# Altium PCB DC-Motor-Driver-v1.0.PcbDoc (part 4 of 5)
Units mil, origin at the board's own origin, x right, y up, seen from the top; angles counter-clockwise.
Board outline 1968.5 x 1574.8 mil, 4 copper layers (Top Layer, Signal 1, Signal 2, Bottom Layer), stack 62.055 mil thick; 133 components, 124 nets, 619 pads, 342 vias.
Unrouted connection lines stored in the file: 5.
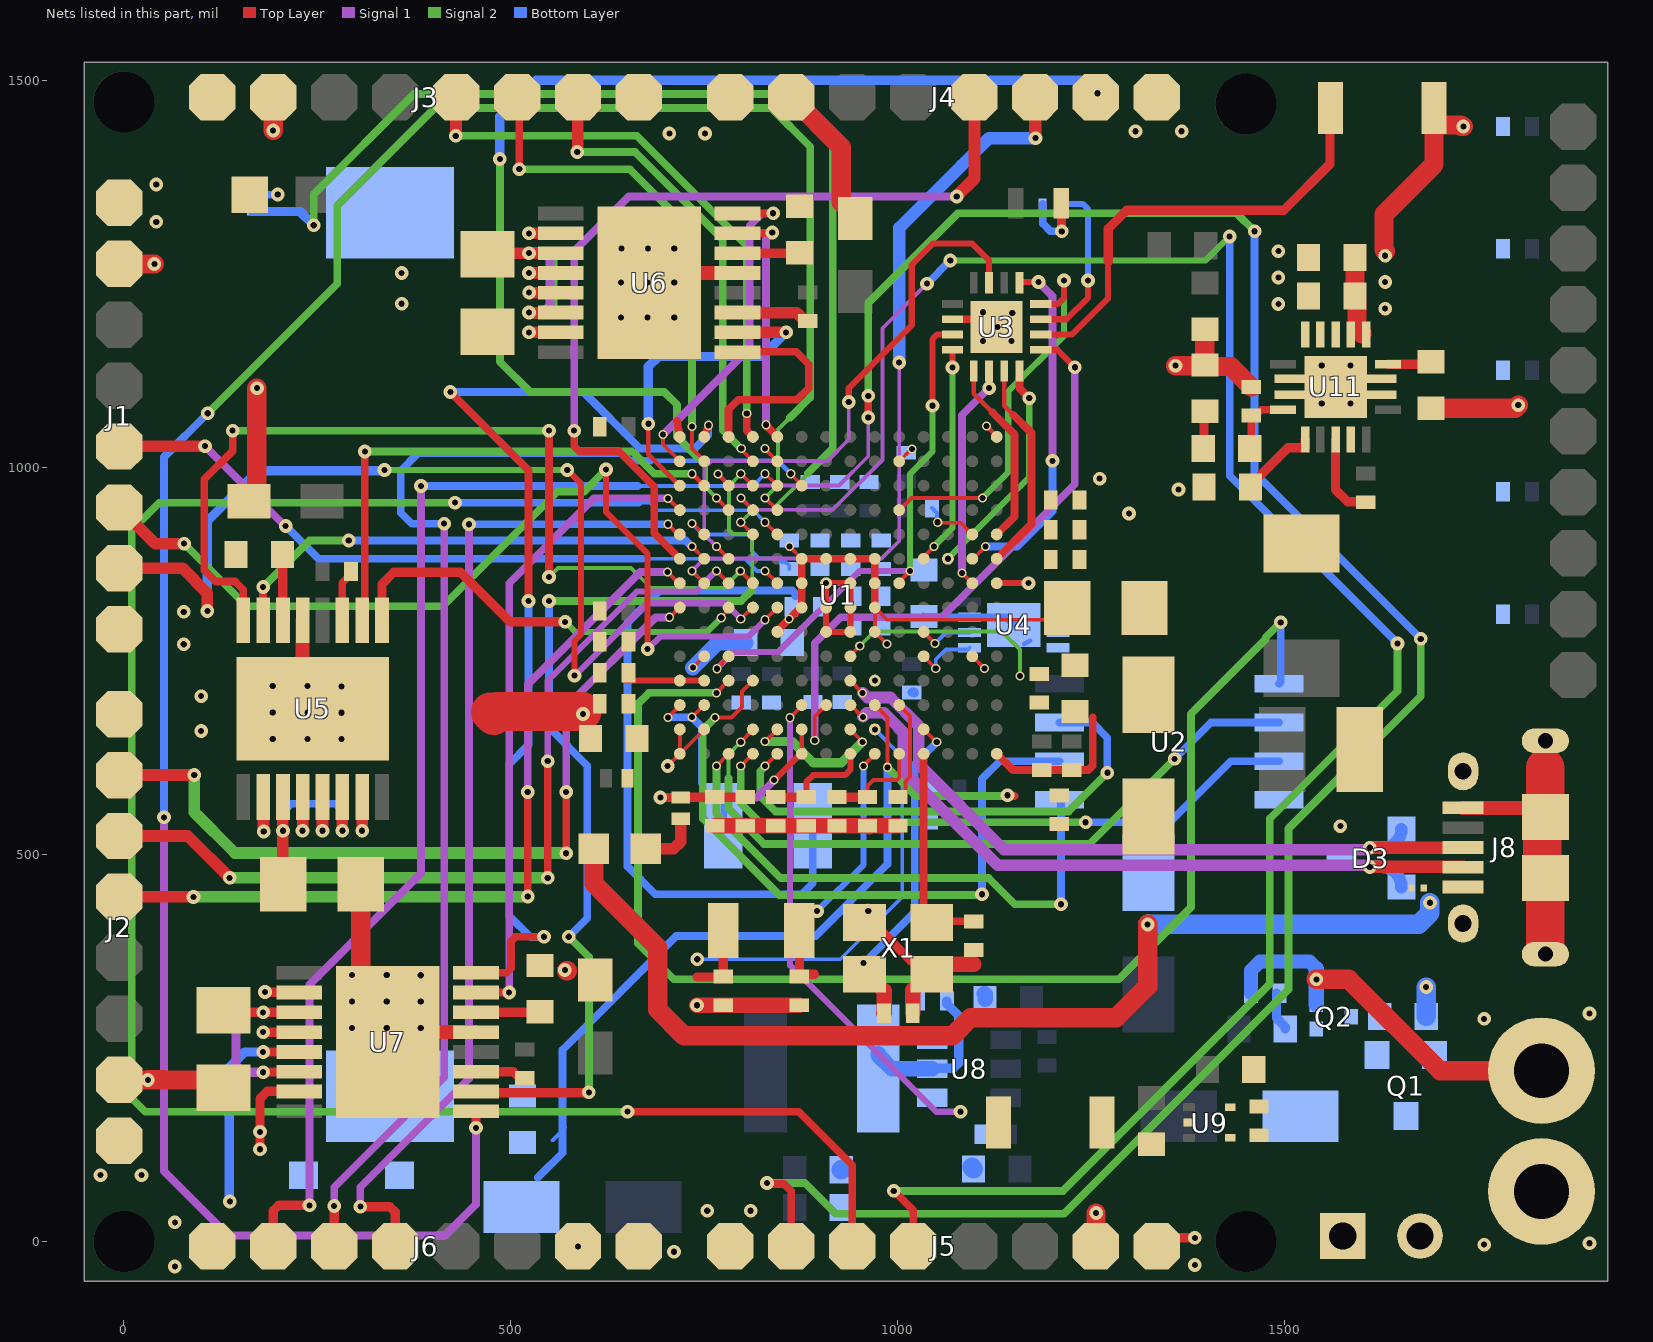
[diagram p4: the nets of this part, all layers, seen from the top]

## Via types
v1: diameter 17.72, hole 7.87, Top Layer to Bottom Layer, tented both sides, 254 vias
v2: diameter 11.81, hole 7.87, Top Layer to Bottom Layer, tented both sides, 88 vias

## Nets (pads, with @x,y where several pads share a name; then routed paths per layer and width w, separated by ;. In a path a pad name is that pad's centre, name@x,y a point inside that pad or via, vN(x,y) a via of type N, cw(c..) or ccw(c..) an arc to the next point about the centre after c; other vN are vias at no path point) (continued)
GND: C1.1 C2.1 C3.1 C4.1 C5.1 C6.1 C7.1 C8.1 C9.1 C10.1 C11.1 C12.1 C13.1 C14.1 C15.1 C16.1 C17.1 C18.1 C19.1 C20.1 C21.1 C22.1 C23.1 C24.1 C25.2 C26.1 C27.1 C28.1 C29.2 C30.1 C31.1 C32.1 C33.1 C34.1 C35.1 C36.1 C37.1 C38.1 C39.2 C40.2 C41.1 C42.2 C43.2 C44.1 C45.1 C46.1 C48.1 C49.2 C50.2 C51.2 C55.1 C56.1 C57.1 C59.1 C60.1 C61.1 C62.1 C63.1 C64.1 C65.1 C66.1 C67.1 C68.1 C69.1 D3.3 D4.1 D6.1 J1.2 J2.2 J3.2 J4.2 J5.2 J6.2 J7.2 J8.5 J8.MP1 J8.MP2 J8.S1 J8.S2 J8.S3 J8.S4 J9.2 Q2.2 R2.1 R3.1 R4.1 R5.1 R6.1 R7.1 R11.1 R13.1 R14.1 R15.1 R17.1 R18.1 R21.1 SW1.1 SW2.1 U1.A1 U1.A14 U1.B5 U1.B10 U1.E2 U1.E13 U1.G7 U1.G8 U1.G14 U1.H7 U1.H8 U1.J7 U1.J8 U1.K2 U1.K13 U1.L9 U1.N1 U1.N2 U1.N5 U1.N8 U1.P1 U1.P14 U2.4 U3.2 U3.17 U4.1 U4.2 U4.3 U4.4 U4.7 U4.9 U5.13 U5.17 U6.13 U6.17 U7.13 U7.17 U8.4 U9.2 U9.4 U11.2 U11.3 U11.15 X1.2 X1.4 | length 4800.3
  Top Layer w5: v1(702.8,614.76) U1.P1@718.54,630.51 ; U1.N1@718.54,662.01 U1.P1@718.54,630.51 ; v2(734.29,928.25) 735.03,928.25 749.3,913.98 U1.E2@750.04,913.98 ; v2(735.45,741.91) U1.K2@750.04,756.5 ; U1.N2@750.04,662.01 U1.P1@718.54,630.51 ; v2(828.78,646.26) U1.N5@844.53,662.01 ; v2(828.78,1024.89) 828.78,1024.21 U1.B5@844.53,1008.46 ; U1.N8@939.02,662.01 939.02,661.56 954.32,646.26 v2(954.32,645.81) ; U1.B10@1002.01,1008.46 1017.76,1024.21 v2(1018.41,1024.21) ; v2(1051.75,929.72) 1052.47,929 1081.24,929 1096.26,913.98 U1.E13@1096.5,913.98 ; U1.K13@1096.5,756.5 v2(1112.24,740.75) ; v2@1115,1053.48 v2(1115,1054) ; U1.A14@1127.99,1039.96 U1.A14@1127.99,1040.48
  Top Layer w6: v2@1115,1053.48 U1.A14@1127.99,1040.48
  Top Layer w8: U1.J7@907.52,787.99 U1.J8@939.02,787.99 U1.G8@939.02,850.98 v2(907.52,850.98) U1.H7@907.52,819.49 907.52,798.22 ; U1.J7@907.55,788.03 907.55,798.19 ; U1.G14@1127.99,850.98 v1(1169,851)
  Top Layer w10: 715,1061 716.59,1050.53 ccw(c734.29,1053.21) 716.69,1049.94 U1.A1@718.54,1039.96 ; U3.2@1070.83,1192 1118.07,1192 U3.17@1127.91,1182.16 ; U1.P14@1127.99,629.06 U1.P14@1127.99,630.26 ; U1.P14@1127.99,630.51 1149,609.5 C11.1@1186,609.5 C10.1@1225,609.5 1246.14,609.5 1252,615.36 1252,677.76
  Top Layer w12: X1.4@957.24,412.46 967.54,412.46 1016.84,363.16 1022.29,363.16 X1.2@1039.91,345.54 ; X1.4@970.25,409.75 X1.4@971.53,411.03
  Top Layer w18: U5.17@231,701.83 U5.17@244,688.83 ; U5.17@231.2,740 U5.13@231.2,803 ; U7.17@326.28,328.46 U7.17@339.28,315.46 ; U7.17@353.62,270.8 U7.13@455,270.8 ; U6.17@691.62,1251.8 U6.13@793,1251.8 ; J8.5@1730.7,560.62 J8.MP2@1825.19,560.62
  Top Layer w20: U7.17@340.83,258 U7.17@353.62,270.8 ; v1(740.59,305.5) C43.2@774.54,305.5 C42.2@873.04,305.5 ; C2.1@763.54,537.5 C1.1@803.04,537.5 C3.1@842.54,537.5 C4.1@882.04,537.5 C5.1@921.54,537.5 C6.1@961.04,537.5 C6.1@962.54,537.5 ; X1.4@952.54,417.16 X1.4@957.24,412.46 ; v1(961.97,427.14) 961.97,423.73 X1.4@963.54,422.16 ; C6.1@963.54,536.5 C6.1@962.54,537.5 ; C7.1@1000.54,537.5 C6.1@962.54,537.5 ; C39.2@1019.5,295 1019.5,324.91 1026.29,331.7 1026.29,331.91 1039.91,345.54 X1.2@1043.85,345.54 1056.81,358.5 1098.54,358.5
  Top Layer w25: J2.2@-6,209.3 -5.7,209 v1(31.14,209) ; J1.2@-5.74,1263.48 v1(39.5,1263.48) ; v1(31.14,209) 50.96,209.04 51,209 119,209 R15.1@129,199 ; C49.2@161.76,957 172,967.24 v1(172,1103) ; v1@193.26,1436 J3.2@193.26,1479 ; R13.1@306,462 306,292.83 U7.17@340.83,258 ; R14.1@452.5,1158.5 R14.1@470,1176 ; v1@572,350 v1@573,350 ; U6.17@674,1304 U6.17@686,1316 ; J4.2@862.56,1479 927,1414.56 C50.2@927,1342.95 ; J5.2@1256.26,-6 v1@1256.26,37 ; v1(1359,1132) 1396,1132 C69.1@1397,1133 ; R21.1@1397,1179 1397,1135.5 1398.5,1134 1397.25,1132.75 1399.02,1130.98 1430.52,1130.98 C68.1@1457,1104.5 ; v1(1541,339) 1583,339 1701.09,220.91 J7.2@1832,220.91 ; C65.1@1591,1272 C48.1@1591,1222 1593.5,1219.5 1593.5,1181.41 1600,1174.91 U11.2@1600,1173 ; v1@1630,1280 1628.52,1281.48 1628.52,1327.52 1693,1392 SW1.1@1693,1465 ; R17.1@1689,1077 1798,1077 v1(1802,1081) ; SW1.1@1695,1443 v1@1728,1443 ; v1@1728,1441 v1(1731,1441) ; J8.MP2@1825.19,560.62 J8.MP2@1837,548.81
  Top Layer w50: U5.17@244,688.83 U5.17@248.41,684.41 ; U7.17@339.28,315.46 U7.17@343.7,311.04 ; 473.59,684.41 478,680 483,685 v1@592.48,685 ; J8.MP1@1833,470.07 J8.MP2@1833,548.81 ; J8.S4@1837,381.49 J8.MP1@1837,470.07 ; J8.MP2@1837,548.81 1837,612
  Signal 2 w8: v2@907.52,850 v2(907.52,850.98)
  Signal 2 w12: v2(828.78,646.26) 863.74,646.26 891,619 927.5,619 v2(954.32,645.81)
  Bottom Layer w5: v2(734.29,928.25) 748.54,914 809.16,914 812.09,911.07 812.09,891.85 821.11,882.82 846.18,882.82 850.5,878.5 854.9,878.5 860,873.4 C31.1@860,869 ; C15.1@1016.62,1026 v2(1018.41,1024.21) ; C13.1@1044.5,948 1051,941.5 1051,930.47 v2(1051.75,929.72)
  Bottom Layer w6: U4.9@1163.7,772.44 U4.9@1171.1,776.57
  Bottom Layer w10: C12.1@1018,709.5 C12.1@1021.5,709.5 ; R2.1@1033,808 1034.16,806.84 U4.7@1092.91,806.84 1140.16,806.84 U4.9@1150,797
  Bottom Layer w12: C12.1@1019,710 1021,710 C12.1@1021.5,709.5
  Bottom Layer w18: R18.1@1456.5,321 1456.5,350.5 1468,362 1532,362 1541,353
  Bottom Layer w20: v1(570,351) v1@570.98,351 ; v2(735.45,741.91) 767.79,774.24 C28.1@803.78,774.24 ; R11.1@1112,320.5 1113,319.5 R11.1@1113,313 ; Q2.2@1541,306.5 v1(1541,339) 1541,353
  Bottom Layer w25: C61.1@927,93 C61.1@928,94 ; C60.1@1096,96 C60.1@1098,94 ; J8.S1@1729,409 J8.S1@1730.7,410.7 ; J8.S1@1730.7,409.98 J8.S1@1730.7,410.7 ; J8.S1@1730.7,411.02 J8.S1@1730.7,410.7 ; J8.S2@1730.7,607.87 J8.S2@1730.7,608.9
  other v1: 586.96,-6 1256.52,37 294.78,276.03 339.85,276.03 383.78,276.03 1757.91,287.91 1894,295 383.78,310.13 294.78,310.56 339.85,310.56 383.78,344.24 294.78,344.67 339.85,344.67 1572,537 192.5,649.4 237.57,649.4 281.5,649.4 593.48,682 192.5,683.93 237.57,683.93 281.5,683.5 192.5,718.04 237.57,718.04 281.5,717.61 1299,941 1363,972 1261,986 1548,1083 1585.27,1083 1548,1132 1585.27,1132 1110.27,1164 1147.27,1164 1129.18,1182.16 642.61,1194.5 676.72,1194.5 711.26,1194.5 1148.09,1200.31 1110.27,1201 1630,1205.73 642.61,1239.57 676.72,1239.57 711.26,1239.57 1630,1240 1630,1274 643.04,1283.5 677.15,1283.5 711.26,1283.5 193,1436
  other v2: 970.51,725
M1_A: J1.5 U1.G5 | length 924.2
  Top Layer w5: v2(828.78,866.73) U1.G5@844.53,850.98
  Top Layer w10: J1.5@-6,1027.52 J1.5@-5.48,1027
  Top Layer w15: J1.5@-5.48,1027 -4.72,1027.76 104.76,1027.76 v1(105,1028)
  Signal 1 w10: v1(105,1028) v1@208.67,924.33
  Bottom Layer w5: 670,882.48 802.72,882.48 818.47,866.73 v2(828.78,866.73)
  Bottom Layer w10: v1(209.22,924.88) 251.62,882.48 670,882.48
M1_B: J1.6 U1.H5 | length 1199.5
  Top Layer w5: v2(828.78,803.74) U1.H5@844.53,819.49
  Top Layer w8: v1(623,997.83) 623,943 676.9,889.1 v1(676.9,765.96)
  Top Layer w15: J1.6@-6,948.78 40.78,902 v1(78,902)
  Signal 1 w8: v1(676.9,765.96) 692.95,782 807.04,782 v2(828.78,803.74)
  Signal 2 w10: v1(78,902) 159,821 412,821 560,969 594.69,969 623,997.31 v1(623,997.83)
M1_Z: J1.7 U1.H4 | length 1319.5
  Top Layer w5: v2(797.28,804.65) 812.12,819.49 U1.H4@813.03,819.49
  Top Layer w8: v1(573,997.31) 591,979.31 591,784.81 582.54,776.36 v1(582.54,731.46)
  Top Layer w15: J1.7@-6,870.04 75.96,870.04 108,838 v1(108,815)
  Signal 1 w8: v1(582.54,731.46) 676.08,825 777.14,825 797.28,804.85 v2(797.28,804.65)
  Signal 2 w8: v1(337,997.31) v1(573,997.31)
  Bottom Layer w12: v1(108,815) 108,931 173.38,996.38 336.07,996.38 v1(337,997.31)
M2_A: J2.5 U1.G1 | length 1064.5
  Top Layer w5: v2(702.37,865.33) 716.72,850.98 U1.G1@718.54,850.98
  Top Layer w10: v1(522,446) v1(522,581)
  Top Layer w15: J2.5@-6,445.52 v1(90,445.52) v1@91,445.52
  Signal 1 w10: v1(522,581) 522,720 667.33,865.33 v2(702.37,865.33)
  Signal 2 w15: v1@91,445.52 91.24,445.76 v1@521.76,445.76
M2_B: J2.6 U1.G3 | length 1129.9
  Top Layer w5: v2(765.79,866.73) U1.G3@781.54,850.98
  Top Layer w10: v1(547.81,470.17) v1(547.81,621)
  Top Layer w15: J2.6@-6,524.26 82.68,524.26 v1(136.77,470.17)
  Signal 1 w8: v1(547.81,621) 547.81,724.81 663,840 739.06,840 v2(765.79,866.73)
  Signal 2 w15: v1(136.77,470.17) v1(547.81,470.17)
M2_Z: J2.7 U1.H1 | length 1036.6
  Top Layer w5: v2(705.34,806.91) 705.65,806.91 718.23,819.49 U1.H1@718.54,819.49
  Top Layer w10: v1(571.62,502) v1(571.62,581)
  Top Layer w15: J2.7@-6,603 v1(91,603)
  Signal 1 w10: v1(571.62,581) 571.62,691.04 687.14,806.56 705,806.56 v2(705.34,806.91)
  Signal 2 w15: v1(91,603) 91,555 143.69,502.31 v1@571.62,502.31
M3_A: J3.5 U1.A4 | length 735.4
  Top Layer w5: U1.A4@813.03,1039.96 U1.A4@813.03,1040.24
  Top Layer w10: v2(805,1070) 805,1048.27 U1.A4@813.03,1040.24
  Top Layer w15: v1(429,1429) 429.24,1429.24 429.24,1478.76 J3.5@429.48,1479
  Signal 2 w10: v1(429,1429) 663,1429 805,1287 v2(805,1070)
M3_B: J3.6 U1.B2 | length 654.5
  Top Layer w5: v2(734.29,1053.21) 734.29,1025.21 750.04,1009.47 U1.B2@750.04,1008.46
  Top Layer w10: J3.6@508.22,1479 511,1476.22 v1(511,1386)
  Signal 2 w10: v1(511,1386) 654,1386 734.29,1305.71 v2(734.29,1053.21)
M3_Z: J3.7 U1.B4 | length 610.9
  Top Layer w5: v2(797.94,1024.89) 797.94,1023.56 U1.B4@813.03,1008.46
  Top Layer w10: J3.7@586.96,1479 J3.7@589.32,1476.64
  Top Layer w15: v1(586,1408) 586.48,1408.48 586.48,1473.81 J3.7@589.32,1476.64
  Signal 2 w10: v1(586,1408) 661,1408 774,1295 774,1048.82 v2(797.94,1024.89)
M4_A: J4.5 U1.F1 | length 1148.1
  Top Layer w10: v1(582,1048) 582,1028 589,1021 640,1021 685.36,975.64 685.36,915.66 U1.F1@718.54,882.48
  Top Layer w16: v1(1076.37,1350.63) 1076.37,1351.09 1099.26,1373.98 J4.5@1099.26,1478.52
  Signal 1 w10: v1@582,1045 v1(582,1048) 582,1280.26 652.37,1350.63 v1(1076.37,1350.63)
M4_B: J4.6 U1.G2 | length 987.8
  Top Layer w5: v2(734.29,866.73) U1.G2@750.04,850.98 ; J4.6@1177.52,1479 J4.6@1178,1478.52
  Top Layer w16: v1(1178,1426) J4.6@1178,1478.52
  Signal 1 w5: v2(734.29,866.73) 750.35,882.79 979.29,882.79 1002,905.5 v1(1002,1136)
  Bottom Layer w16: v1(1002,1136) 1002,1310 1083,1391 1118,1426 v1(1178,1426)
M4_Z: J4.7 U1.D3 | length 1530.9
  Top Layer w5: v2(765.79,961.12) U1.D3@781.54,945.47
  Signal 2 w5: 742,1013 752.25,1002.75 752.25,974.75 765.79,961.22 v2(765.79,961.12)
  Signal 2 w10: v1(486,1399) 486,1137 525,1098 698.34,1098 715,1081.34 715,1040 742,1013
  Bottom Layer w12: v1(486,1399) 486,1454 532.86,1500.86 1241.14,1500.86 v1(1258,1484)
M5_A: J6.5 U1.E1 | length 1310.9
  Top Layer w5: v2(703.27,927.11) 716.4,913.98 U1.E1@718.54,913.98
  Top Layer w12: v1(305.67,45.33) 343.71,45.33 350.74,38.3 J6.5@350.74,-6
  Signal 1 w10: v1(305.67,45.33) 305.67,70.33 446,210.65 v1@446,927.86
  Bottom Layer w10: v1(446,927.11) v2(703.27,927.11)
M5_B: J6.6 U1.C6 | length 1654.5
  Top Layer w5: v2(861.9,992.41) 861.9,991.75 876.02,977.63 U1.C6@876.02,976.97
  Top Layer w12: J6.6@272,-6 v1@272,46.16
  Signal 1 w10: v1(271.84,46.16) 271.84,70.16 414,212.33 v1(414,927.86)
  Bottom Layer w6: 680,1008.98 845.32,1008.98 v2(861.9,992.41)
  Bottom Layer w10: v1(414,927.86) 372.14,927.86 357.86,942.14 357.86,996.36 380.19,1018.68 644.31,1018.68 654.02,1008.98 680,1008.98
M5_Z: J6.7 U1.C5 | length 1558.3
  Top Layer w5: v2(828.78,992.41) 828.94,992.41 844.37,976.97 U1.C5@844.53,976.97
  Top Layer w12: J6.7@193.26,-6 193.26,39.97 200.29,47 v1(240,47)
  Signal 1 w10: v1(240,47) 240,332 384,476 v1(384,976.45)
  Bottom Layer w5: 664,976.53 812.9,976.53 v2(828.78,992.41)
  Bottom Layer w10: v1(384,976.45) 644.93,976.45 645,976.53 664,976.53
M6_A: J5.5 U1.D4 | length 2709.1
  Top Layer w5: v2(797.41,961.12) U1.D4@813.03,945.47
  Top Layer w10: v1(995,65.64) 1020.04,40.6 J5.5@1020.04,-6
  Signal 1 w5: v2(797.41,961.12) 812.76,945.77 916.01,945.77 980.36,1010.12 980.36,1180.36 v1(1038,1238)
  Signal 2 w8: v1(1068,1268) 1398,1268 v1(1429,1299)
  Signal 2 w10: v1(995,65.64) 1213.64,65.64 1481,333 1481,546.74 1646,711.74 v1(1646,773)
  Bottom Layer w10: v1(1038,1238) v1(1068,1268) ; v1(1429,1299) 1429,990 v1(1646,773)
M6_B: J5.6 U1.E5 | length 2671.5
  Top Layer w5: v2(828.78,929.72) U1.E5@844.53,913.98
  Top Layer w10: v1(651,168) 872,168 941.3,98.7 J5.6@941.3,-6
  Signal 2 w10: v1(428,955) 46,955 10.28,919.28 10.28,185.41 27.69,168 v1(651,168)
  Bottom Layer w5: 665,955 680,955 689.87,945.13 813.37,945.13 v2(828.78,929.72)
  Bottom Layer w10: v1(428,955) 665,955
M6_Z: J5.7 U1.C3 | length 3049.1
  Top Layer w5: v2(767.66,991.93) 767.66,991.39 781.54,977.51 U1.C3@781.54,976.97
  Top Layer w10: v1(831.14,75.95) 832.62,74.47 853.53,74.47 862.56,65.44 J5.7@862.56,-6 ; v1(962,1065) v1(962,1093)
  Signal 1 w5: v2(767.66,991.93) 782.59,977 924,977 962,1015 v1(962,1065)
  Signal 2 w10: v1(831.14,75.95) 880.05,75.95 920,36 1215,36 1505,326 1505,534 1676,705 v1(1676,779) ; v1(962,1093) 962,1213 1078,1329 1437.93,1329 v1(1461.27,1305.67)
  Bottom Layer w10: v1(1461.27,1305.67) 1461.27,993.73 v1(1676,779)
MOTOR_1+: J1.8 U5.2 | length 44.9
  Top Layer w15: U5.2@180.02,574.65 180.47,574.21 180.47,530.55 v1(180.91,530.11)
  other v1: 77.46,772 77.46,813.93
MOTOR_1-: J1.1 U5.4 | length 47.3
  Top Layer w10: U5.4@231.1,574.55 U5.4@231.2,574.65
  Top Layer w15: J1.1@-6,1342.48 J1.1@-3.49,1344.99 ; v1(231,531) 231.1,531.1 U5.4@231.1,574.55
  other v1: 42,1317.93 42,1366
MOTOR_1_B: U1.F2 U5.15 | length 648.1
  Top Layer w5: v2(734.29,898.23) U1.F2@750.04,882.48
  Top Layer w10: U5.15@180.02,803 v1(180.02,846)
  Signal 1 w10: v2@733.8,898.23 v2(734.29,898.23)
  Signal 2 w10: v1(180.02,846) 240.02,906 v1(290.64,906)
  Bottom Layer w10: v1(290.64,906) 726.52,906 v2(734.29,898.23)
MOTOR_1_F: U1.G4 U5.16 | length 1187.8
  Top Layer w5: v2(796.69,866.73) 812.43,850.98 U1.G4@813.03,850.98
  Top Layer w10: v1(140.69,1048) 140.69,1021.69 104,985 104,868 119,853 144,853 154.43,842.57 U5.16@154.43,803 ; v1(549.46,859) v1(549.46,1048)
  Signal 2 w5: v1(549.46,859) 549.88,859 561.24,870.36 655.64,870.36 681,845 774.95,845 v2(796.69,866.73)
  Signal 2 w10: v1(140.69,1048) v1(549.46,1048)
MOTOR_2+: J2.8 U5.7 | length 44.3
  Top Layer w15: J2.8@-6,681.74 J2.8@-5.55,681.29 ; v1(307.98,531) U5.7@307.98,574.65
  other v1: 100,659.93 100,705
MOTOR_2-: J2.1 U5.5 | length 43.7
  Top Layer w15: v1(256.8,531) U5.5@256.8,574.65
  other v1: -30,86 23,86
MOTOR_2_B: U1.C2 U5.10 | length 676.5
  Top Layer w5: v2(734.29,992.41) v2@734.45,992.41 ; U1.C2@749.88,976.97 U1.C2@750.04,976.97
  Top Layer w6: v2@734.45,992.41 U1.C2@749.88,976.97
  Top Layer w10: U5.10@307.98,803 311.5,806.52 v1(311.5,1021.19)
  Signal 2 w10: v1(311.5,1021.19) 656.81,1021.19 685.59,992.41 v2(734.29,992.41)
MOTOR_2_F: U1.H3 U5.9 | length 548.1
  Top Layer w5: v2(772,806.23) 772,807.57 781.54,817.11 U1.H3@781.54,819.49
  Top Layer w12: U5.9@333.57,803 333.57,849.57 349,865 435,865 499,801 v1(570.32,801)
  Signal 2 w8: v1(570.32,801) 583.33,787.99 753.76,787.99 v2(772,806.23)
MOTOR_3+: J3.8 U6.2 | length 50.4
  Top Layer w15: v1(523.73,1302.98) U6.2@564.65,1302.98 ; J3.8@665.7,1479 671.09,1473.61 J3.8@671.09,1471.97
  Signal 2 w10: v1@523.59,1303.12 v1(523.73,1302.98)
  other v1: 705,1431.93
MOTOR_3-: J3.1 U6.4 | length 40.9
  Top Layer w15: v1(523.73,1251.8) U6.4@564.65,1251.8
  other v1: 359,1212 359,1251.8
MOTOR_3_B: U1.A5 U6.15 | length 318.8
  Top Layer w5: v2@829.94,1055.11 v2(829.94,1055.67) ; U1.A5@844.53,1039.96 U1.A5@844.53,1040.52
  Top Layer w10: U6.15@793,1302.98 793.51,1303.49 837.49,1303.49 v1(838,1304) ; v2@829.94,1055.11 U1.A5@844.53,1040.52
  Signal 1 w10: v2(829.94,1055.67) 829.94,1295.94 v1(838,1304)
MOTOR_3_F: U1.B1 U6.16 | length 442.9
  Top Layer w5: v2(697,1043) 697,1030.01 U1.B1@718.54,1008.46
  Top Layer w10: U6.16@793,1328.57 793.22,1328.78 838.93,1328.78 v1(839.14,1329)
  Signal 1 w10: v2(697,1043) 808.79,1154.79 808.79,1312.79 825,1329 v1(839.14,1329)
MOTOR_4+: J4.8 U6.7 | length 42.6
  Top Layer w10: J4.8@1335,1479 J4.8@1336,1480
  Top Layer w15: v1(523.63,1175.13) 523.68,1175.08 564.6,1175.08 U6.7@564.65,1175.02
  Signal 1 w15: v1@523.53,1175.02 v1(523.63,1175.13)
  other v1: 1307.46,1434.93 1367,1434.93
MOTOR_4-: J4.1 U6.5 | length 44.5
  Top Layer w10: J4.1@783,1478.18 J4.1@783.82,1479
  Top Layer w15: v1(523.76,1226.6) 523.96,1226.4 564.45,1226.4 U6.5@564.65,1226.2 ; J4.1@783,1478.18 J4.1@783.78,1477.4
  Signal 2 w16: v1@523.43,1226.28 v1(523.76,1226.6)
  Bottom Layer w15: v1@523.24,1227.12 v1(523.76,1226.6)
  other v1: 751,1431.93
MOTOR_4_B: U1.C1 U6.10 | length 429.9
  Top Layer w6: v1(677.86,1057) 677.86,1017.65 U1.C1@718.54,976.97
  Top Layer w15: U6.10@793,1175.02 v1(855.86,1175.02)
  Bottom Layer w12: v1(677.86,1057) 677.86,1130.86 691,1144 824.83,1144 v1(855.86,1175.02)
MOTOR_4_F: U1.A3 U6.9 | length 271
  Top Layer w10: U1.A3@781.54,1039.96 781.54,1075.54 786.12,1080.12 794,1088 870,1088 885,1103 885,1134 869,1150 U6.9@802,1150
MOTOR_5+: J6.8 U7.2 | length 44.3
  Top Layer w12: v1(182.6,322.63) 182.93,322.3 226.33,322.3 U7.2@226.65,321.98
  other v1: 66,-32 66,25
MOTOR_5-: J6.1 U7.4 | length 62.1
  Top Layer w12: v1(180.14,270.8) U7.4@226.65,270.8 ; J6.1@665.7,-6 J6.1@676.7,5
  other v1: 711,-13
MOTOR_5_B: U1.D1 U7.15 | length 843.9
  Top Layer w5: v2(703.27,960.54) U1.D1@718.33,945.47
  Top Layer w10: U7.15@455,321.98 v1(498,321.98)
  Signal 1 w10: v1(498,321.98) 498,850.88 607.66,960.54 v2(703.27,960.54)
MOTOR_5_F: U1.A2 U7.16 | length 1314.3
  Top Layer w10: v1(422,1098) 523,997 v1(523,828) ; U7.16@455,347.57 494.57,347.57 500.42,353.42 500.42,388.14 506.28,394 v1(543,394) ; U1.A2@750.04,1039.96 750.59,1041.46 v2(755.62,1055)
  Bottom Layer w10: v1(422,1098) 594,1098 666.91,1025.09 738.09,1025.09 755.27,1042.27 755.27,1054.65 v2(755.62,1055) ; v1@523,830.05 v1(523,828) 523,642 498.19,617.19 498.19,420.81 525,394 v1(543,394)
MOTOR_6+: J5.8 U7.7 | length 120.2
  Top Layer w12: v1(176,119.5) 176,184.88 185.56,194.44 226.24,194.44 U7.7@226.65,194.02
  other v1: 754,40 810,40 176,142
MOTOR_6-: J5.1 U7.5 | length 326
  Top Layer w12: v1(180.14,245.2) U7.5@226.65,245.2 ; J5.1@1335,-6 1346,5 v1(1384,5)
  Bottom Layer w12: v1(137,51.86) 136.22,52.64 136.22,225.22 156.2,245.2 v1(180.14,245.2)
  other v1: 1384,-30
MOTOR_6_B: U1.C4 U7.10 | length 1294.6
  Top Layer w5: v2(797.28,992.41) 797.44,992.41 812.88,976.97 U1.C4@813.03,976.97
  Top Layer w12: U7.10@455,194.02 456.52,192.5 600.5,192.5 v1(601,193)
  Signal 2 w5: v2(797.28,992.41) 797.28,991.93 782,976.65 782,941.23 781.88,941.11 781.88,919.12 786.68,914.32 806.68,914.32 812.09,908.91 812.09,855
  Signal 2 w10: v1(549.46,828) 798,828 812.09,842.09 812.09,855 ; v1(575,394) 601,368 v1(601,193)
  Bottom Layer w10: v1(549.46,828) 549.46,664.54 599,615 599,418 v1(575,394)
MOTOR_6_F: U1.D5 U7.9 | length 3092.2
  Top Layer w5: v2(828.78,961.22) U1.D5@844.53,945.47
  Top Layer w12: v1(455,147.14) U7.9@455,168.43
  Signal 1 w10: v1(52,548.36) 52,91 135,8 415,8 455,48 v1(455,147.14)
  Signal 2 w5: v2(828.78,961.22) 845.34,977.78 845.34,1049.34 861,1065
  Signal 2 w10: v1(108.52,1070.52) 276,1238 276,1339 402,1465 837,1465 887,1415 887,1091 861,1065
  Bottom Layer w10: v1@52,555.36 52,1014 v1(108.52,1070.52)
NetC1_2: C1.2 C2.2 FB1.2 U1.N6 U1.P6 | length 348.3
  Top Layer w6: U1.P6@876.02,630.51 U1.N6@876.02,662.01
  Top Layer w8: v2(840.41,596.41) 874.51,630.51 U1.P6@876.02,630.51
  Top Layer w12: v1(693.35,574) FB1.2@719.54,574 ; FB1.2@719.54,572 723.48,572 725.98,574.5 C2.2@763.54,574.5 C1.2@803.04,574.5
  Signal 1 w10: v1(693.35,574) 818,574 v2(840.41,596.41)
NetC3_2: C3.2 C4.2 U1.P8 | length 143.1
  Top Layer w8: C4.2@882.04,574.5 882.04,594.04 891,603 932,603 939.02,610.02 U1.P8@939.02,630.51
  Top Layer w12: C3.2@842.54,574.5 C4.2@882.04,574.5
NetC5_2: C5.2 C6.2 U1.P10 | length 130.5
  Top Layer w5: C6.2@961.04,574.5 961.04,589 968.54,596.5 999.08,596.5 1002.14,599.56 1002.14,630.38 U1.P10@1002.01,630.51
  Top Layer w12: C5.2@921.54,574.5 C6.2@961.04,574.5
NetC7_2: C7.2 U1.M10 | length 133.2
  Top Layer w5: C7.2@1001.82,576 1005,576 1010,581 1010,594.69 1016.19,600.88 1016.19,679.33 U1.M10@1002.01,693.5
  Top Layer w10: C7.2@1000.54,574.5 C7.2@1001.98,575.93
NetC24_2: C24.2 C25.1 C26.2 C27.2 FB2.2 U1.L1 U1.L2 | length 101.6
  Top Layer w8: C26.2@648.47,725 U1.L1@718.54,725 U1.L2@750.04,725
NetC28_2: C28.2 C29.1 C30.2 C31.2 C32.2 C33.2 C34.2 C35.2 C36.2 C37.2 C38.2 C41.2 L1.1 U1.F6 U1.F7 U1.F8 U1.F9 U1.G6 U1.G9 U1.H6 U1.H9 U1.J5 U1.J9 | length 1465.8
  Top Layer w5: v2(860.28,898.23) U1.F6@876.02,882.48 ; U1.H9@970,820 U1.H9@970.51,819.49 ; v2(986.26,772.24) U1.J9@970.51,787.99 U1.H9@970.51,819.49 ; C41.2@1198.33,803.74 986.26,803.74 U1.H9@970.51,819.49
  Top Layer w10: U1.J5@844.53,787.99 844.53,789.44 v2@859.21,804.12 ; v2@859.9,804.81 874.58,819.49 U1.H6@876.02,819.49 U1.G6@876.02,850.98 U1.F6@876.02,882.48 U1.F7@907.52,882.48 U1.F8@939.02,882.48 U1.F9@970.51,882.48 U1.G9@970.51,850.98 U1.H9@970.51,819.49
  Bottom Layer w8: C31.2@860.28,898.28 C31.2@861,899
  Bottom Layer w10: 868,834 868,837.5 864,841.5 692.58,841.5 664.54,813.46 660.14,809.06 651,799.92 651,484.86 686.86,449 876,449 890.37,463.37 L1.1@890.37,537.5
  other v2: 859.55,804.46
NetC39_1: C39.1 U1.N11 X1.1 | length 423.6
  Top Layer w5: U1.N11@1033.5,662.01 1033.79,662.01 1050.28,645.52 v2(1050.57,645.52)
  Top Layer w20: v1(956,360) 956,346.77 X1.1@957.24,345.54 ; X1.1@961.17,345.54 982.5,324.21 C39.1@982.5,295 C39.1@982,295.5
  Bottom Layer w10: v1(956,360) 1022,426 1022,616.96 v2(1050.57,645.52)
NetC40_1: C40.1 U1.P11 X1.3 | length 301.3
  Top Layer w8: X1.3@1043.85,412.46 X1.3@1060.81,395.5
  Top Layer w10: U1.P11@1033.5,632.97 1033.5,425.5 1045,414 C40.1@1098.54,414
NetC42_1: C42.1 U1.P9 X2.2 | length 314.7
  Top Layer w5: v2(955.92,614.76) 955.92,615.34 970.51,629.93 U1.P9@970.51,630.51
  Top Layer w12: X2.2@872.76,402 873.04,401.71 C42.1@873.04,342.5 876.04,345.5 892.5,345.5
  Bottom Layer w8: v1(895.69,427.14) 955.92,487.38 v2(955.92,614.76)
NetC43_1: C43.1 U1.N9 X2.1 | length 622.8
  Top Layer w12: 740.59,342 C43.1@774.04,342 ; X2.1@774.33,402 774.54,401.79 C43.1@774.54,342.5
  Bottom Layer w5: v1(741,365) 925.79,365 1006,445.21 1006,626.52 v2(970.51,662.01)
NetC44_2: C44.2 C45.2 D7.2 U1.K8 | length 276.8
  Top Layer w5: U1.K8@939.02,756.5 939.02,757.83 v2(951.09,769.91)
  Signal 2 w5: v2(951.09,769.91) 969.74,788.55 1134.45,788.55 1158,765 v2(1158,731)
NetC46_2: C46.2 D1.1 D7.1 R20.1 U1.M9 | length 1113.5
  Top Layer w5: U1.M9@970.96,693.5 987,677.46 987,613.27 v2(986.73,613)
  Top Layer w10: v1(1141.86,576.86) 1142.72,576 1151,576
  Signal 2 w10: v2(986.73,613) 986.73,612.87 1023.6,576 1141,576 v1(1141.86,576.86)
  Bottom Layer w5: 554,131 570.5,147.5
  Bottom Layer w10: 535,83 567,115 567,248 714,395 894,395 986.73,487.73 v2(986.73,613)
NetC47_1: C47.1 L3.1 U11.11 U11.12 | length 109.4
  Top Layer w12: U11.11@1565.91,1036.56 1565.91,971.75 1581.67,956 C47.1@1604,956
NetC52_1: C52.1 U5.11 | length 67.6
  Top Layer w10: U5.11@282.39,803 282.39,851.39 293.5,862.5 C52.1@293.5,866
NetC53_1: C53.1 U6.11 | length 95.6
  Top Layer w15: U6.11@793,1200.61 793.11,1200.5 869.5,1200.5 880.5,1189.5 C53.1@884,1189.5
NetC54_1: C54.1 U7.11 | length 64.1
  Top Layer w12: U7.11@455,219.61 503.39,219.61 C54.1@511.5,211.5 ; C54.1@515,211.5 C54.1@518,208.5
NetC55_2: C55.2 U5.14 | length 85.3
  Top Layer w12: C55.2@205,888 205.31,887.69 205.31,803.31 U5.14@205.61,803
NetC56_2: C56.2 U6.14 | length 79.4
  Top Layer w12: U6.14@793,1277.39 C56.2@872.39,1277.39
NetC57_2: C57.2 U7.14 | length 83
  Top Layer w12: U7.14@455,296.39 C57.2@538,296.39
NetC58_1: C58.1 L2.1 U8.5 | length 202.9
  Bottom Layer w12: U8.5@1045,223.4 1045.6,224 1071.97,224 1079,231.03 1079,292 1063.5,307.5 C58.1@1063.5,311
  Bottom Layer w20: L2.1@974.97,243 974.97,240.96 992.53,223.4 U8.5@1045,223.4
NetC58_2: C58.2 U8.6
NetC67_2: C67.2 U11.9 | length 102.3
  Top Layer w12: C67.2@1459,975 1459,980.5 1504.33,1025.83 1526.06,1025.83 1526.54,1026.32 U11.9@1526.54,1036.56
NetC68_2: C68.2 R16.2 U11.8 | length 74.9
  Top Layer w10: R16.2@1455,1025 1457,1027 1457,1064 C68.2@1456,1065 ; C68.2@1466,1071 1469.94,1074.94 U11.8@1498,1074.94
NetC69_2: C69.2 R16.1 | length 49.2
  Top Layer w12: C69.2@1394,1073 1396,1071 1396,1026 R16.1@1395,1025
NetF1_2: F1.2 FB1.1 | length 78.4
  Top Layer w15: F1.2@674.46,508 710.76,508 719.54,516.79 FB1.1@719.54,546.44
NetL1_2: L1.2 U1.M1 U1.M2 | length 208.7
  Top Layer w5: v2(703.24,677.31) 703.24,677.76 718.54,693.06 U1.M1@718.54,693.5 ; v2(734.29,677.76) U1.M2@750.04,693.5
  Bottom Layer w5: L1.2@750,549.04 L1.2@761.54,537.5
  Bottom Layer w8: v2(703.24,677.31) v2@703.47,677.53 ; v2@734.07,677.53 v2(734.29,677.76) ; L1.2@775.5,540.01 L1.2@775.5,566.86
  Bottom Layer w10: v2@703.47,677.53 v2@734.07,677.53 ; v2(734.29,677.76) 747,665.05 747,593.5
NetLED1_2: LED1.2 R1.1 | length 90.6
  Top Layer w12: LED1.2@1211.53,1342 1211.76,1341.76 1211.76,1305.88 v1(1212,1305.64)
  Bottom Layer w10: R1.1@1187.35,1341 1187.35,1315.86 1197.56,1305.64 v1(1212,1305.64)
NetLED2_2: LED2.2 R22.2 | length 33
  Top Layer w10: LED2.2@162.66,1353 LED2.2@162.83,1353.17
  Bottom Layer w10: R22.2@166.32,1352.97 175.11,1352.97 ; 175.14,1353 198.83,1353 v1(199,1353.17)
NetQ1_1: Q1.1 Q2.3 R9.2
NetQ2_1: Q2.1 R10.2 R18.2 | length 50.8
  Bottom Layer w12: R18.2@1489.5,321 1489.5,289 1501,277.5 R10.2@1501,275
NetR1_2: R1.2 U3.11 | length 226.5
  Top Layer w8: U3.11@1185,1192 1218,1192 1246,1220 v1(1246,1242)
  Bottom Layer w8: R1.2@1209,1341 1239,1341 1246,1334 v1(1246,1242)
NetR2_2: R2.2 U1.G10 U1.K3 U3.3 | length 686.4
  Top Layer w5: v2(766.34,740.41) 766.34,740.85 781.54,756.05 U1.K3@781.54,756.5 ; U1.G10@1000.35,850.98 v2(1016.09,866.73)
  Top Layer w8: v1(1045,1080.23) 1045,1166 1051.31,1172.31 U3.3@1070.83,1172.31
  Signal 1 w8: v2(766.34,740.41) 787.94,762 846,762 950.73,866.73 v2(1016.09,866.73)
  Signal 2 w8: v2(1016.09,866.73) 1016.09,992.09 1045,1021 v1(1045,1080.23)
NetR13_2: R13.2 U5.3 U5.6 | length 292.2
  Top Layer w15: U5.3@205.61,574.65 v1(205.61,531) 205.61,462.39 R13.2@206,462 ; v1(282.39,531) U5.6@282.39,574.65
  Bottom Layer w10: v1(205.61,531) 205.61,555.61 216,566 274,566 282.39,557.61 v1(282.39,531)
NetR14_2: R14.2 U6.3 U6.6 | length 386.2
  Top Layer w15: R14.2@470,1276 471.39,1277.39 v1(523.73,1277.39) U6.3@564.65,1277.39 ; v1(523.73,1200.61) U6.6@564.65,1200.61
  Signal 1 w12: v1(523.73,1200.61) 524.35,1200 543.68,1200 550.71,1207.03 550.71,1270.36 543.68,1277.39 v1(523.73,1277.39)
  Signal 2 w15: v1(523.73,1200.61) 544.19,1200.61 553,1209.42 553,1271.53 547.14,1277.39 v1(523.73,1277.39)
NetR15_2: R15.2 U7.3 U7.6 | length 278.9
  Top Layer w12: R15.2@129,299 131.61,296.39 185.98,296.39 U7.3@226.65,296.39 ; v1(180.14,219) 180.45,219.31 226.35,219.31 U7.6@226.65,219.61
  Signal 1 w12: v1(180.14,219) 153,219 145,227 145,280 161.27,296.27 180.03,296.27 v1(180.14,296.39)
NetR17_2: R17.2 U11.1 | length 64.1
  Top Layer w12: U11.1@1633.83,1134 1688,1134 R17.2@1695,1141
NetSW1_2: SW1.2 U3.10 | length 590.3
  Top Layer w8: U3.10@1185,1172.31 1185.16,1172.16 1225.16,1172.16 1272,1219 1272,1267
  Top Layer w12: 1272,1267 1272,1309 1296,1333 1499,1333 1558.57,1392.57 1558.57,1464.43 SW1.2@1559.14,1465
NetSW2_2: SW2.2 U1.M6 | length 641.1
  Top Layer w5: v2(861.05,677.09) 876.02,692.07 U1.M6@876.02,693.5
  Signal 1 w8: v2(861.05,677.09) 861.04,356.96 1050.14,167.86 v1(1081.11,167.86)
NetU1_D10: U1.D10 U3.12 | length 494.1
  Top Layer w5: U1.D10@1002.01,945.47 1017.76,961.22 v2(1109.75,961.22)
  Top Layer w8: U3.12@1185,1211.68 1206.69,1211.68 1215,1220 v1(1215,1242)
  Signal 2 w8: v2(1109.75,961.22) 1143,994.47 1143,1099 1215,1171 v1(1215,1242)
NetU1_E14: U1.E14 U3.5 | length 242.4
  Top Layer w6: U3.5@1098.39,1125.07 1098.39,1095.94 1122.42,1071.91
  Top Layer w10: 1122.42,1071.91 1151,1043.32 1151,936.98 U1.E14@1127.99,913.98
NetU1_F3: U1.F3 U3.15 | length 740.9
  Top Layer w5: v2(765.79,898.23) U1.F3@781.54,882.48
  Top Layer w8: v1(936.86,1085) 936.86,1103.12 1018.14,1184.4 1018.14,1262.14 1046,1290 1095.87,1290 1118.07,1267.8 U3.15@1118.07,1239.24
  Signal 1 w5: v2(765.79,898.23) 750,914.02 750,999.79 759.21,1009 909.23,1009 936.86,1036.63 v1(936.86,1085)
NetU1_F11: U1.F11 U3.4 | length 285.6
  Top Layer w5: U1.F11@1033.5,882.48 1033.5,884.94 v2(1046.96,898.4)
  Top Layer w8: v1@1070.83,1129.74 1070.91,1129.83 1070.91,1152.54 U3.4@1070.83,1152.63
  Signal 2 w8: v2(1046.96,898.4) 1070.91,922.35 v1(1070.91,1129.66)
NetU1_F12: U1.F12 U3.8 | length 291.4
  Top Layer w10: U3.8@1157.44,1125.07 1157.44,1102.67 v1(1170.11,1090)
  Signal 2 w8: v2(1065,882.48) 1170.11,987.59 v1(1170.11,1090)
NetU1_F13: U1.F13 U3.13 | length 457.4
  Top Layer w5: U1.F13@1096.5,882.48 1097.74,882.48 v2(1113.49,898.23)
  Top Layer w8: U3.13@1157.44,1239.24 1158.2,1240 v1(1182,1240)
  Signal 1 w10: v1(1182,1240) 1200.14,1221.86 v1(1200.14,1009)
  Bottom Layer w10: v2(1113.49,898.23) 1154.23,898.23 1200.14,944.14 v1(1200.14,1009)
NetU1_F14: U1.F14 U3.7 | length 277.3
  Top Layer w5: U3.7@1136.69,1124 U3.7@1137.76,1125.07
  Top Layer w6: U3.7@1137.76,1125.07 1137.76,1080.24 1149.54,1068.46
  Top Layer w10: U1.F14@1127.99,882.48 1173,927.49 1173,1045 1149.54,1068.46
NetU1_G13: U1.G13 U3.6 | length 285.8
  Top Layer w5: v2(1083,864) 1083.24,864 1096.26,850.98 U1.G13@1096.5,850.98
  Top Layer w10: U3.6@1118.15,1116.29 1118.15,1103.36 v1(1118.26,1103.26)
  Signal 1 w10: v2(1083,864) 1083,1068 v1(1118.26,1103.26)
NetU1_J11: U1.J11 U4.6 | length 71.4
  Top Layer w5: U1.J11@1033.5,787.99 v2(1048.35,773.14)
  Bottom Layer w5: v2(1048.35,773.14) 1062.37,787.16 1081.34,787.16 U4.6@1092.91,787.16
NetU1_K11: U1.K11 U4.5 | length 83.7
  Top Layer w5: U1.K11@1033.5,756.5 v2(1049.25,740.75)
  Bottom Layer w5: v2(1049.25,740.75) 1049.25,752.25 1062.3,765.3 1090.74,765.3 U4.5@1092.91,767.47
NetU1_L3: U1.L3 U2.1 | length 1707.5
  Top Layer w5: v2(765.79,709.25) U1.L3@781.54,725
  Signal 2 w10: v2(765.79,709.25) 678.8,709.25 664.54,695 664.54,385.46 710.86,339.14 1285.82,339.14 1379,432.33 1379,682 1475.77,778.77 1475.77,781.13 v1(1495,800.36)
  Bottom Layer w10: U2.1@1492.93,721 1495,723.07 v1(1495,800.36)
NetU1_L4: U1.L4 U2.6 | length 878.5
  Top Layer w5: v2(764.05,677.35) 785.43,677.35 798.85,690.77 798.85,710.82 U1.L4@813.03,725
  Signal 2 w10: v2(764.05,677.35) 748,661.29 748,547 847,448 1108,448 v1(1109,449)
  Bottom Layer w10: v1(1109,449) 1109,598 1132,621 U2.6@1209.07,621
NetU1_M7: U1.M7 U3.9 | length 803.5
  Top Layer w5: v2(892.91,647.51) 892.91,678.89 U1.M7@907.52,693.5
  Top Layer w8: U3.9@1185,1152.63 1206.37,1152.63 v1(1229,1130)
  Signal 1 w10: v2(892.91,647.51) 892.91,773.38 926.53,807 1057,807 1229,979 v1(1229,1130)
NetU1_N4: U1.N4 U2.2 | length 910.8
  Top Layer w5: v2(797.28,645.48) 797.28,645.87 813.03,661.62 U1.N4@813.03,662.01
  Signal 2 w5: 781.54,599.02 781.54,629.73 v2(797.28,645.48)
  Signal 2 w10: 781.54,599.02 781.54,559.46 827,514 1248,514 v1(1358,624)
  Bottom Layer w10: v1(1358,624) 1405,671 U2.2@1492.93,671
NetU1_P3: U1.P3 U2.5 | length 713.4
  Top Layer w5: v2(765.91,614.76) v2(765.91,614.76) U1.P3@781.54,630.51 U1.P3@781.54,630.51
  Signal 2 w10: v2(765.91,614.76) 765.79,614.65 765.79,553.21 849.14,469.86 1117.64,469.86 1151.5,436 v1(1211,436)
  Bottom Layer w10: U2.5@1209.07,571 1211,569.07 v1(1211,436)
NetU1_P4: U1.P4 U2.3 | length 808.9
  Top Layer w5: v2(797.28,614.76) U1.P4@813.03,630.51
  Signal 2 w10: v2(797.28,614.76) 797.28,566.76 822.04,542 v1(1243,542)
  Bottom Layer w10: v1(1243,542) 1351.5,542 1430.5,621 U2.3@1492.93,621
NetU1_P5: U1.P5 U2.7 | length 656.7
  Top Layer w5: v2(828.78,614.76) U1.P5@844.53,630.51
  Signal 2 w10: v2(828.78,614.76) 828.78,614.27 822.5,607.99 822.5,575.5 842,556 1221,556 v1(1271,606)
  Bottom Layer w10: U2.7@1209.07,671 1251.14,671 1271,651.14 v1(1271,606)
"TEST LED": R22.1 U1.E4 | length 1450.3
  Top Layer w5: v2(797.28,929.72) U1.E4@813.03,913.98
  Signal 2 w5: v2(797.28,929.72) 813.37,945.81 837.57,945.81 884,992.24 884,993.1
  Signal 2 w10: v1(245.46,1313.52) 245.46,1353.46 375,1483 849,1483 916,1416 916,1025.1 884,993.1
  Bottom Layer w12: R22.1@166.32,1331.32 227.67,1331.32 v1(245.46,1313.52)
USB_D_N: D3.2 J8.2 U1.M8 | length 968.2
  Top Layer w5: U1.M8@939.02,693.5 939.46,693.5 954.76,678.2 v2(955.21,678.2)
  Top Layer w16: v1(1610,484.29) 1730.7,484.29 J8.2@1730.7,483.85
  Signal 1 w15: v2(955.21,678.2) 960.29,683.28 982.43,683.28 1007.14,658.58 1007.14,608.72 1129.21,486.65 1603.24,486.65 ccw(c1610,509) 1609.57,485.65 cw(c1607.64,484.29) v1(1610,484.29)
  Bottom Layer w16: v1(1610,484.29) 1624.91,484.29 cw(c1624.91,458.2) D3.2@1651,458.2
USB_D_P: D3.1 J8.3 U1.L8 | length 967.6
  Top Layer w5: U1.L8@939.02,725 v2(954.76,709.25)
  Top Layer w16: v1(1610,509) 1730.7,509 J8.3@1730.7,509.44
  Signal 1 w15: v2(954.76,709.25) 960.73,703.28 990.72,703.28 1027.14,666.86 1027.14,617 1137.49,506.65 1603.24,506.65 cw(c1610,484.29) 1609.57,507.64 ccw(c1607.64,509) v1(1610,509)
  Bottom Layer w16: v1(1610,509) 1627,509 ccw(c1627,533) D3.1@1651,533
USB_VBUS: D4.2 D5.2 F1.1 J8.1 | length 1381.8
  Top Layer w12: J8.1@1729.44,457 J8.1@1730.7,458.26
  Top Layer w25: F1.1@607.54,508 607.54,462.46 690,380 690,300 724,266 1070.9,266 1094.25,289.36 1282.36,289.36 1323,330 v1(1323,410)
  Bottom Layer w25: v1(1323,410) 1673.15,410 1687.8,424.64 v1(1687.8,438)
V_BAT_BUCK: D2.2 Q1.3
V_RTC: D6.2 J9.1 R20.2
VBAT: C48.2 C63.2 C65.2 J10.1 Q1.2 R9.1 R12.2 U9.5 U11.4 U11.5 U11.6 | length 38
  Bottom Layer w25: R9.1@1683,291 v1(1683,329)
  other v1: 1492,1211.73 1492,1246 1492,1280
VBAT_IN: J7.1 J10.2
  other v1: 1757.91,-3.84 1894,-2
pads on no net: J1.4 J2.4 J3.4 J4.4 J5.4 J6.4 J8.4 U1.A7 U1.A8 U1.A9 U1.A10 U1.A11 U1.A12 U1.A13 U1.B7 U1.B8 U1.B9 U1.B11 U1.B12 U1.B13 U1.B14 U1.C7 U1.C8 U1.C9 U1.C10 U1.C11 U1.C12 U1.C13 U1.C14 U1.D6 U1.D7 U1.D8 U1.D9 U1.D11 U1.D12 U1.D13 U1.D14 U1.E7 U1.E8 U1.E10 U1.E11 U1.E12 U1.G11 U1.G12 U1.H2 U1.H10 U1.H11 U1.H12 U1.H13 U1.H14 U1.J1 U1.J2 U1.J3 U1.J4 U1.J13 U1.J14 U1.K1 U1.K6 U1.K9 U1.K10 U1.K14 U1.L5 U1.L6 U1.L7 U1.L10 U1.L13 U1.L14 U1.M3 U1.M4 U1.M5 U1.M11 U1.M13 U1.M14 U1.N3 U1.N7 U1.N10 U1.N12 U1.N13 U1.P2 U1.P7 U1.P13 U3.14 U3.16 U9.3 U11.14

## Polygon pours and split planes (outlines as drawn)
MOTOR_5- on Bottom Layer "MOTOR_5-_L04_P025" (solid, pour order 25): 205,280 205,255 145,255 125,235 125,-0.5 671.2,-0.5 736,-0.5 736,-45 85,-45 85,280
GND on Bottom Layer "GND_L04_P039" (solid, remove dead copper, pour order 39): -51,-50.8 -51,1524 1917.5,1524 1917.5,-50.8
MOTOR_4+ on Bottom Layer "MOTOR_4+_L04_P036" (solid, remove dead copper, pour order 36): 764.99,1312 1387,1312 1387,1464 780,1464 780,1358 764.99,1358 597,1358 597,1188.64 504.49,1188.64 504.49,1159.64 616,1159.64 616,1312
MOTOR_1- on Bottom Layer "MOTOR_1-_L04_P031" (solid, pour order 31): 85,1376 85,1285 40,1285 40,510 220,510 220,541 240,541 240,450 -35,450 -35,1376
MOTOR_4- on Bottom Layer "MOTOR_4-_L04_P035" (solid, remove dead copper, pour order 35): 504.5,1240 504.5,1211 585,1211 585,1367 765,1367 765,1465 534,1465 534,1240
MOTOR_1+ on Bottom Layer "MOTOR_1+_L04_P030" (solid, remove dead copper, pour order 30): 195,515 195,615 139,615 139,844 65,844 65,515
MOTOR_2- on Bottom Layer "MOTOR_2-_L04_P027" (solid, pour order 27): 270,541 270,370 31,370 31,74 -37,74 -37,440 245,440 245,541
MOTOR_5+ on Bottom Layer "MOTOR_5+_L04_P026" (solid, pour order 26): 75,-45 75,310 76,309 200,309 200,336 40,336 40,296 40,-45
GND on Top Layer "GND_L01_P037" (solid, remove dead copper, pour order 37): -51,-50.8 -51,1524 1917.5,1524 1917.5,-50.8
MOTOR_3- on Top Layer "MOTOR_3-_L01_P032" (solid, pour order 32): 150,1510.04 150,1400 130,1400 130,1265 370,1265 370,1200 66,1200 66,1510.04
6V on Signal 1 "6V_L02_P016" (solid, remove dead copper, pour order 16): 848,1504 135,1504 135,821 318,821 318,1459 829.94,1459 829.94,1057.17 1390,1057.17 1390,1350 1681,1350 1680,1349 1680,723 1907,723 1907,1504
3V3 on Signal 1 "3V3_L02_P040" (solid, remove dead copper, pour order 40): 362,502.31 362,719 316,719 316,721 -26,721 -26,1507 120,1507 120,789 361,789 361,786 363,786 363,789 1413,789 1413,-35 -25,-35 -25,502.31
MOTOR_2+ on Signal 1 "MOTOR_2+_L02_P029" (solid, remove dead copper, pour order 29): 320,520 295,520 295,574.51 62,574.51 62,716 140,716 140,715 140,714 140,620 320,620
MOTOR_3+ on Signal 1 "MOTOR_3+_L02_P034" (solid, remove dead copper, pour order 34): 326,1295 326,1448 734,1448 734,1381 584,1381 584,1295
MOTOR_3- on Signal 1 "MOTOR_3-_L02_P033" (solid, remove dead copper, pour order 33): 534,1240 475,1240 475,1200 325,1200 325,1278 489,1278 489,1265 534,1265
VBAT on Signal 1 "VBAT_L02_P021" (solid, pour order 21): 1651,699 1717,699 1717,689.5 1717,82 1620,82 1620,-36 1500,-36 1500,1057 1405,1057 1405,1325 1651,1325
GND on Signal 2 "GND_L03_P038" (solid, remove dead copper, pour order 38): -51,-50.8 -51,1524 1917.5,1524 1917.5,-50.8
MOTOR_6+ on Signal 2 "MOTOR_6+_L03_P024" (solid, pour order 24): 829,28 229.82,30.12 230.14,100 144,100 144,150 144,151 829,151
MOTOR_6- on Signal 2 "MOTOR_6-_L03_P023" (solid, remove dead copper, pour order 23): 203,73 203,12 1398,12 1398,-40 114,-40 114,73

## Other copper
Top Layer:
  rectangle net NetC46_2: 1287,497 1358,607
  rectangle net NetC44_2: 1284,657 1358,761
  rectangle net MOTOR_1-: -40,1309.18 53,1378.18
  rectangle net GND: 1083,348.5 1114.54,386.5
  rectangle net NetC43_1: 730,330.29 811.29,450.29
  rectangle net NetC42_1: 850,330 910,450
  rectangle net 3V3: 1058,1205 1083,1242
  rectangle net NetC47_1: 1567,865 1617,964
  rectangle net MOTOR_2-: -44,76 35,165
  rectangle net MOTOR_4+: 1296.82,1422.91 1380.82,1517.91
  region net MOTOR_4-: 821.18,1517.09 737.18,1517.09 737.18,1422.09 821.18,1422.09
  rectangle net NetLED2_2: 139,1328 209,1386
  rectangle net 3V3: 221,1330 464,1381
  rectangle net MOTOR_1+: -40,758 90,827
  rectangle net MOTOR_2+: -40,650 113,720
  region net MOTOR_6+: 741.82,53 741.82,-43 820.82,-43 820.82,53
  region net MOTOR_6-: 1395,36 1303.52,36 1303.52,-43 1395,-43
  region net MOTOR_5-: 723.22,36 634.22,36 634.22,-43 723.22,-43
  rectangle net MOTOR_5+: 57,-43 146,36
  rectangle net NetC44_2: 1151,721 1358,761
  rectangle net FAULT_3_4: 534,1107 618,1130
  rectangle net FAULT_3_4: 534,1115 595,1157
  rectangle net GND: 1170,667 1257,713
  rectangle net MOTOR_3+: 631,1421 715,1516
  rectangle net 6V: 248,826 266,859
  rectangle net GND: 333,646 623,714
  rectangle net GND: 921.54,386 994,468.5
  rectangle net 3V3: -46,257 9,318
  rectangle net 3V3: 1139,1296 1167,1362
  region net GND: 136.05,981.9 136.05,932 195.05,932 195.05,981.9
  region net GND: 122,982 122,869 163,869 163,982
  region net USB_VBUS: 1677,463 1677,426 1699,426 1699,463
  rectangle net NetC7_2: 984.64,565 1019,587
  rectangle net GND: 1226,-38 1287.33,200
  rectangle net NetSW2_2: 1066,111 1149,200
  rectangle net GND: 1286,954 1416,994
  rectangle net GND: 1287,877 1350,977
  rectangle net GND: 1225.87,869.63 1350,994
  region net NetC28_2: 1250,861 1185,861 1185,784 1250,784
  rectangle net NetC28_2: 1185,785 1209,974.49
  rectangle net ENABLE_5_6: 197,342.29 256,394
  rectangle net 6V: 1423,574 1536,778
  rectangle net GND: 1566,575 1668,689
  rectangle net GND: 1652,601 1724,670
  region net VBAT: 1571.83,1193.95 1509,1193.95 1509,1154.95 1571.83,1154.95
  rectangle net VBAT: 1473,1156 1554,1295
  rectangle net GND: 1581,1156 1648,1290
  rectangle net GND: 1580.28,1103.39 1606,1172.39
  rectangle net NetC47_1: 1560,1015 1590.6,1054
  region net VBAT_IN: 1911,138 1641,138 1641,-42 1911,-42
  region net VBAT: 1609,181 1535,181 1535,-42 1609,-42
  rectangle net GND: 1397,136 1415,159
  rectangle net GND: 1245,105 1349,159
  rectangle net GND: 1307,148.63 1415,159
  region net BUCK_EN: 1415,240 1307,240 1307,168 1415,168
  rectangle net GND: 1397,125.63 1481,148.63
  rectangle net VBAT: 1444,165 1609,243.45
  rectangle net VBAT: 1422,165 1481,188
  rectangle net GND: 903,1287 965,1309
  rectangle net GND: 855,1305 965,1380
  rectangle net GND: 602,632 624,829
  rectangle net NetC24_2: 655,587 678,668
  rectangle net NetC24_2: 643,587 661,791.2
  rectangle net GND: 519,330 631,378
  region net GND: 1883,351.96 1883,438 1707,438 1707,351.96
  region net GND: 1883,670 1799,670 1799,351.96 1883,351.96
  region net GND: 1867.51,551 1867.51,670 1704,670 1704,551
  region net USB_VBUS: 1759,466 1676.87,466 1676.87,449 1759,449
  rectangle net GND: 1676,1425 1745,1499
  region net 6V: 632,214 632,278 578,278 578,214
  rectangle net 6V: 503,234 609,265
  region net 6V: 286,1037 225,1037 225,931 286,931
  region net 6V: 268,843.43 268,1031 237,1031 237,843.43
  rectangle net 6V: 848,1215 964,1246
  region net 6V: 965,1169 965,1262 906,1262 906,1169
  pour cut-out: 1422.14,941 1422.14,703.86 1423,703 1624,703 1624,940.5 1622.28,938.78 1617.81,938.78 1598,918.97 1598,856 1597,855 1459,855 1455,859 1455,941
  region net NetC46_2: 1294,587 1294,570 1294,565 1129.5,565 1129.5,587
Bottom Layer:
  rectangle net 3V3: 1077,820 1108,836
  rectangle net V_RTC: 401,164 536.97,219.61
  rectangle net 6V: 414,287 454,800
  rectangle net 6V: 228,754 454,857
  rectangle net NetC46_2: 455,9 502,91
  rectangle net NetC46_2: 494,9 573,150
  rectangle net V_RTC: 261,63 433,250
  region net VBAT_IN: 1911,138 1740,138 1740,-42 1911,-42
  rectangle net NetQ1_1: 1566,218 1645,319
  rectangle net BUCKIN: 1177,161 1303,237
  rectangle net BUCKIN: 1136,76 1318,198
  region net BUCKIN: 1265,372 1265,134 1413,134 1413,372
  rectangle net NetL1_2: 743,481 803.5,599
  rectangle net GND: 1460,473 1591,583
  rectangle net NetL1_2: 747.5,481 803.5,599.02
  rectangle net 3V3: 1069,529 1090,622
  rectangle net USB_VBUS: 1265,396 1413,530
  rectangle net 3V3_ENABLE: 1177,246 1233,293
  rectangle net 3V3_ENABLE: 1157,288 1233,331
  rectangle net NetR2_2: 1011,853 1051,883
  rectangle net 3V3: 1003,736 1033,780.12
  rectangle net GND: 888,783 955,862
  rectangle net NetC28_2: 964,756.24 996,847
  rectangle net NetC28_2: 844,756.24 880.02,847
  rectangle net GND: 844,859.32 1002.4,885.32
  rectangle net 3V3: 781,723 941.46,749
  rectangle net GND: 876,972 979,991
  rectangle net 3V3: 997,924 1027,992
  rectangle net 3V3: 852.4,924 1027,963
  rectangle net NetC28_2: 844,894 1002.4,915
  rectangle net VBAT: 1535,-42 1609,119
  rectangle net VBAT: 1535,68 1718,119
  rectangle net VBAT: 1683,68 1718,227
  rectangle net VBAT: 1656.6,219 1718,342
  region net BUCK_EN: 1425,294.69 1425,257 1457,257 1457,294.69
  region net NetQ2_1: 1517,257 1517,334 1478.5,334 1478.5,257
  region net NetC58_2: 1016,324 1016,249 1038,249 1038,324
  rectangle net NetQ2_1: 1486,257 1550,288
  region net V_BAT_BUCK: 1673,188 1471,188 1471,134 1673,134
  region net 3V3: 890,23 890,309 797,309 797,137 847,137 847,23
  pour cut-out: 748,599.02 922.37,599.02 922.37,475.19 744.32,475.19 743,473.86 743,599
  pour cut-out: 797,121 1007,121 1007,328 797,328

## Silkscreen, mask and mechanical layers (free items; w line width, h text height)
Top Overlay:
  lines w10: 232.42,903.68 304.68,903.68 313.18,912.18 ; 590.5,545.5 604,559 691,559 ; 720,468 736,468 747.54,479.54 747.54,525 ; 876.72,1364 886.72,1374 990,1374 ; 1250,764 1260,771 1364,771 ; 1347.04,1016.04 1367.79,995.29 ; 1355,1059 1369,1045 ; 1620,1220.18 1632.6,1220.18 1638.98,1226.56
  text "FSR5" at 1728.96,1423.07 h45
  text "MOTOR 3" at 76.87,1387.8 h65
  text "MOTOR 4" at 747,1387.8 h65
  text "MOTOR 1" at 29.8,1377 h65 r270
  text "TEST" at 94,1273.4 h65
  text "FSR4" at 1728.96,1265.59 h45
  text "FSR3" at 1728.96,1108.07 h45
  text "FSR2" at 1749.56,950.62 h37
  text "*" at 1254.92,909.59 h100
  text "*" at 1254.92,870.66 h100
  text "*" at 1254.92,831.73 h100
  text "FSR1" at 1728.88,793.14 h45
  text "*" at 566,765.73 h100
  text "*" at 566,725.45 h100
  text "*" at 1170,724.82 h70
  text "MOTOR 2" at 29.8,719.26 h65 r270
  text "*" at 566,684.73 h100
  text "*" at 1296.55,562 h100 r90
  text "*" at 828.37,467.63 h80
  text "*" at 908,468.35 h80
  text "*" at 1193.37,456.73 h100
  text "*" at 1002,455.45 h100
  text "-VE" at 1751,299.58 h45
  text "VBAT" at 1617.98,59.96 h65 r90
  text "VBAT_IN" at 1717.98,59.96 h65 r90
  text "MOTOR 5" at 76.37,30.8 h65
  text "MOTOR 6" at 745.52,30.8 h65
  text "+VE" at 1751,-46.91 h40
Bottom Overlay:
  drawing of 46 lines, arcs and shapes, not listed
  text "NOTE:" at 1364.9,1468.83 h65
  text "*< 0.22uF 0402" at 1364.86,1418.99 h65
  text "*" at 834.19,859.3 h100
  text "*" at 1131,535.45 h100
  text "V1.0" at 172.42,-45.39 h55
Board_Outline:
  the board outline again, w10
Fabrication:
  drawing of 295 lines, arcs and shapes, not listed
  text "Layer" at 2289.09,1469.99 h60
  text "Name" at 2699,1469.99 h60
  text "Material" at 3628.74,1469.99 h60
  text "Thickness" at 4488.51,1469.99 h60
  text "Constant" at 5138.35,1469.99 h60
  text "Board Layer Stack" at 5708.21,1469.99 h60
  text "Top Overlay" at 2699,1349.99 h60
  text "Top Solder" at 2699,1229.99 h60
  text "Solder Resist" at 3628.74,1229.99 h60
  text "0.50mil" at 4488.51,1229.99 h60
  text "3.5" at 5138.35,1229.99 h60
  text "1" at 2289.09,1109.99 h60
  text "Top Layer" at 2699,1109.99 h60
  text "1.18mil" at 4488.51,1109.99 h60
  text "Dielectric 2" at 2699,989.99 h60
  text "PP-006" at 3628.74,989.99 h60
  text "8.28mil" at 4488.51,989.99 h60
  text "4.1" at 5138.35,989.99 h60
  text "2" at 2289.09,869.99 h60
  text "Signal 1" at 2699,869.99 h60
  text "CF-004" at 3628.74,869.99 h60
  text "0.60mil" at 4488.51,869.99 h60
  text "Dielectric 1" at 2699,749.99 h60
  text "FR-4" at 3628.74,749.99 h60
  text "41.93mil" at 4488.51,749.99 h60
  text "4.8" at 5138.35,749.99 h60
  text "3" at 2289.09,629.99 h60
  text "Signal 2" at 2699,629.99 h60
  text "CF-004" at 3628.74,629.99 h60
  text "0.60mil" at 4488.51,629.99 h60
  text "Dielectric 3" at 2699,509.99 h60
  text "PP-006" at 3628.74,509.99 h60
  text "8.28mil" at 4488.51,509.99 h60
  text "4.1" at 5138.35,509.99 h60
  text "4" at 2289.09,389.99 h60
  text "Bottom Layer" at 2699,389.99 h60
  text "1.18mil" at 4488.51,389.99 h60
  text "Bottom Solder" at 2699,269.99 h60
  text "Solder Resist" at 3628.74,269.99 h60
  text "0.50mil" at 4488.51,269.99 h60
  text "3.5" at 5138.35,269.99 h60
  text "Bottom Overlay" at 2699,149.99 h60
  text "Total board thickness:" at 2289.09,29.99 h60
  text "63.06mil" at 4488.51,29.99 h60